# Altium PCB Grantv3.PcbDoc (part 3 of 3)
Units mm, origin at the board's own origin, x right, y up, seen from the top; angles counter-clockwise.
Board outline 132.82 x 71.6 mm, 2 copper layers (Top Layer, Bottom Layer), stack 1.448 mm thick; 97 components, 63 nets, 317 pads, 96 vias.
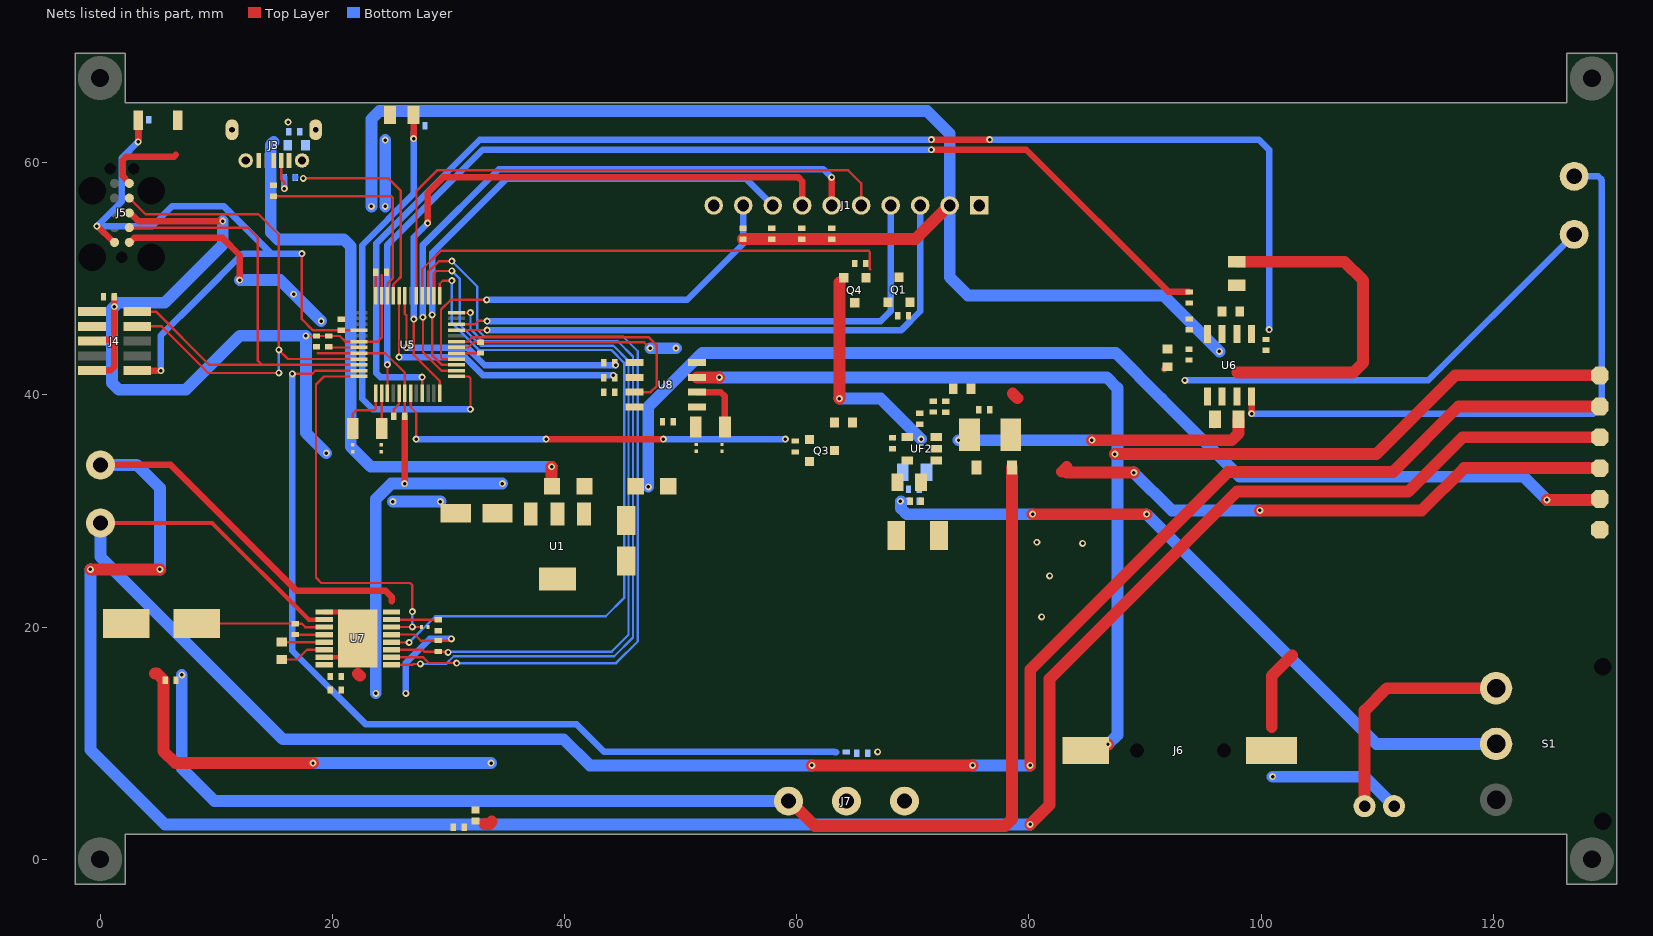
[diagram p2: the nets of this part, all layers, seen from the top]

## Via types
v1: diameter 0.6, hole 0.3, Top Layer to Bottom Layer, tented both sides, 96 vias

## Nets (pads, with @x,y where several pads share a name; then routed paths per layer and width w, separated by ;. In a path a pad name is that pad's centre, name@x,y a point inside that pad or via, vN(x,y) a via of type N, cw(c..) or ccw(c..) an arc to the next point about the centre after c; other vN are vias at no path point)
3V3: C2.1 C8.1 C11.1 C12.1 C13.1 C14.1 C24.1 C29.1 J1.2 J4.1 J5.1 R1.2 R3.2 R6.1 R8.1 R9.2 R12.1 R15.2 R16.2 R17.2 R18.1 R26.2 R33.1 R34.1 U1.3 U5.6 U5.17 U5.36 U5.44 U6.6 U7.5 U8.8 | length 200.2
  Top Layer w0.203: 18.763,43.591 22.293,43.591 22.298,43.586 24.568,43.586 26.251,41.904 U5.6@26.251,40.134 26.245,40.127 26.245,38.157 C13.1@26.238,38.151 ; C11.1@23.736,50.521 23.751,50.506 U5.36@23.751,48.534 ; U7.5@24.612,19.355 27.102,19.355 27.635,18.821 29.121,18.821 R12.1@29.134,18.834 30,18.834 30.144,18.979 v1(30.251,18.979) ; U5.17@30.701,43.584 30.703,43.585 32.752,43.585 C12.1@32.766,43.599
  Top Layer w0.559: J5.1@2.515,53.137 2.576,53.137 2.951,53.511 10.547,53.511 12.027,52.032 v1(12.027,49.886) ; v1(26.238,32.36) C13.1@26.238,38.151 ; C8.1@95.987,37.371 C8.1@96.215,37.6
  Top Layer w1.016: R34.1@55.372,53.416 R33.1@57.861,53.416 R8.1@60.427,53.416 R6.1@63.017,53.416 70.23,53.416 J1.2@73.153,56.339
  Bottom Layer w0.559: v1(26.34,14.289) 26.34,16.916 28.402,18.979 v1(30.251,18.979)
  Bottom Layer w1.016: v1(12.027,49.886) 15.519,49.886 v1(19.05,46.355) ; v1(23.368,56.236) 23.368,63.743 24.065,64.44 71.247,64.44 73.179,62.508 J1.2@73.179,56.314 73.179,50.138 74.752,48.565 91.567,48.565 96.393,43.739 v1(96.418,43.739) ; v1(23.749,14.289) 23.749,31.025 25.083,32.36 v1(26.238,32.36) v1(34.646,32.36)
  other v1: 16.662,48.666
3V3ZD: C7.1 C21.1 CE1.1 CF2.1 CR1.1 D3.A LZ1.1 RZ1.2 S1.2 UF2.5 | length 60.3
  Top Layer w1.016: v1(80.315,29.718) v1(90.145,29.718)
  Bottom Layer w1.016: v1@68.986,30.836 68.986,30.211 69.479,29.718 v1(80.315,29.718) ; v1(90.145,29.718) 109.931,9.931 S1.2@120.241,9.931
  other v1: 68.936,30.836
12V: C22.1 C23.2 C25.1 C26.1 C27.1 D2.K J7.1 P16.1 Q1.2 R24.1 SB3.2 U7.11 | length 173.1
  Top Layer w0.203: C26.1@8.941,20.32 C25.1@16.811,20.29 17.376,20.29 ; 17.431,20.238 17.673,19.996 U7.11@19.3,19.996
  Top Layer w1.016: J7.1@59.18,5.251 61.561,2.87 77.947,2.87 78.542,3.465 D2.K@78.542,33.731 ; J7.1@59.291,5.004 J7.1@59.693,5.004 ; 78.613,40.107 79.019,39.7 ; 82.855,33.376 83.261,33.782 ; 83.261,33.299 v1(89.052,33.299) ; v1(99.898,30.048) 113.843,30.048 117.485,33.691 P16.1@129.184,33.691
  Bottom Layer w1.016: v1(7.036,15.875) 7.036,7.823 9.855,5.004 J7.1@59.291,5.004 ; v1(89.052,33.299) 92.304,30.048 v1(99.898,30.048)
#X1_: C16.2 U5.1 X1.2 | length 4.7
  Top Layer w0.203: X1.2@21.763,37.11 21.768,37.115 21.768,38.358 22.096,38.686 23.632,38.686 23.751,38.805 U5.1@23.751,40.134
#X2_: C17.2 U5.2 X1.1 | length 3
  Top Layer w0.203: U5.2@24.251,40.134 24.251,37.121 X1.1@24.263,37.11
AMP.SHDN: R3.1 U5.9 U6.1 | length 113.3
  Top Layer w0.203: v1(27.737,41.529) 27.744,41.522 27.744,40.141 U5.9@27.751,40.134 ; R3.1@100.432,44.775 R3.1@100.563,44.643
  Top Layer w0.559: v1(71.603,61.976) 76.613,61.976 v1(76.622,61.986)
  Bottom Layer w0.559: v1(27.737,41.529) 24.13,41.529 23.8,41.859 23.8,53.067 32.709,61.976 v1(71.603,61.976) ; v1(76.622,61.986) 99.812,61.986 100.686,61.112 v1(100.686,45.618)
AMP.VOUT: C50.2 U5.3 | length 90.3
  Top Layer w0.203: v1(24.74,42.596) 24.751,42.584 U5.3@24.751,40.134
  Top Layer w0.559: v1(71.603,61.112) 79.781,61.112 92.024,48.87 C50.2@93.764,48.87
  Bottom Layer w0.559: v1(24.74,42.596) 24.74,52.908 32.944,61.112 v1(71.603,61.112)
B_IN1: U5.24 U7.1 | length 63.6
  Top Layer w0.203: U7.1@25.1,16.746 26.924,16.746 26.997,16.818 v1(27.581,16.818) ; U5.24@30.701,47.084 v1(31.902,47.084)
  Bottom Layer w0.203: v1(27.581,16.818) 29.804,16.818 30.469,17.483 44.28,17.483 45.898,19.101 45.898,43.307 44.583,44.622 32.943,44.622 31.902,45.662 v1(31.902,47.084)
B_IN2: U5.27 U7.2 | length 73.1
  Top Layer w0.203: U7.2@25.1,17.396 25.102,17.398 27.821,17.398 28.315,16.903 v1@30.691,16.903 ; U5.27@28.251,48.534 28.251,50.578 29.185,51.511 v1(30.302,51.511)
  Bottom Layer w0.203: v1(30.302,51.511) 32.482,49.332 32.482,45.622 33.101,45.003 45.066,45.003 46.314,43.755 46.314,18.755 44.45,16.891 v1(30.709,16.891)
BST_EN: Q3.1 R11.1 U5.7 | length 35.9
  Top Layer w0.203: U5.7@26.751,40.134 26.751,38.933 27.229,38.456 v1(27.229,36.195)
  Top Layer w0.559: v1@38.411,36.189 38.417,36.189 v1(48.515,36.195)
  Bottom Layer w0.559: v1(27.229,36.195) 38.405,36.195 v1(38.417,36.182) ; v1(48.515,36.195) v1(59.03,36.195)
BUTTON1: J1.6 R6.2 U5.14 | length 53.4
  Top Layer w0.203: v1(27.813,46.685) 27.813,43.674 29.404,42.084 U5.14@30.701,42.084
  Top Layer w0.559: v1(63.017,58.725) v1(63.017,58.725) J1.6@63.019,56.314
  Bottom Layer w0.559: v1(27.813,46.685) 27.813,52.908 34.341,59.436 62.306,59.436 v1(63.017,58.725)
BUTTON2: J1.7 R8.2 U5.12 | length 53.7
  Top Layer w0.203: v1(27.026,46.533) 27.026,43.414 29.251,41.188 U5.12@29.251,40.134
  Top Layer w0.559: v1(28.219,54.788) 28.219,57.379 29.566,58.725 60.151,58.725 60.479,58.397 J1.7@60.479,56.314
  Bottom Layer w0.559: v1(27.026,46.533) 27.026,53.594 ; 27.056,53.624 v1(28.219,54.788)
BUTTON3: J1.8 R33.2 U5.15 | length 44.2
  Top Layer w0.203: v1(28.6,46.888) 28.6,43.426 29.443,42.584 U5.15@30.701,42.584
  Bottom Layer w0.559: v1(28.6,46.888) 28.6,52.222 35.001,58.623 55.629,58.623 J1.8@57.939,56.314
BUTTON4: J1.9 R34.2 U5.16 | length 37.2
  Top Layer w0.203: U5.16@30.701,43.084 29.481,43.084 29.362,43.203 29.362,47.346 30.201,48.184 v1(33.299,48.184)
  Bottom Layer w0.559: v1(33.299,48.184) 50.571,48.184 55.399,53.011 J1.9@55.399,56.314
COIN_VBAT: J6.1 P13.1 U8.3 | length 114.4
  Top Layer w1.016: U8.3@51.414,41.504 v1(53.34,41.504) ; J6.1@84.906,9.373 85.42,9.887 v1(86.817,9.887) ; v1(87.401,34.9) 109.931,34.9 116.713,41.681 129.164,41.681 P13.1@129.184,41.661
  Bottom Layer w1.016: v1(53.34,41.504) 86.716,41.504 87.63,40.589 87.63,10.7 v1(86.817,9.887)
EN_ZD: RZ1.1 SB_ZD1.1 UF2.4
FB#: CF1.1 RF5.2 RF6.2 UF2.3
GND: C1.2 C2.2 C7.2 C8.2 C11.2 C12.2 C13.2 C14.2 C15.2 C16.1 C17.1 C18.2 C19.2 C21.2 C22.2 C23.1 C24.2 C26.2 C27.2 C29.2 C30.2 C31.2 CE1.2 CF2.2 CR1.2 CX1.1 CX2.1 J1.10 J3.5 J3.MH1 J3.MH2 J3.MH3 J3.MH4 J4.3 J4.5 J4.9 J5.3 J5.5 J6.2 J7.3 LED1.2 P1.2 P12.1 P17.2 Q3.2 Q4.2 R2.1 R11.2 R14.2 R19.1 R20.1 R25.1 RF6.1 SW1.2 U1.2 U1.4 U5.5 U5.18 U5.35 U5.42 U6.7 U7.9 U7.15 U7.17 U8.4 UF2.2 | length 251.4
  Top Layer w0.203: v1(17.729,45.085) 17.742,45.072 C14.2@18.644,45.072 C15.2@19.685,45.072 20.637,45.072 21.126,44.584 U5.42@22.301,44.584 22.308,44.577 23.901,44.577 24.251,44.927 U5.35@24.251,48.534 24.251,50.286 24.282,50.317 ; U7.17@20.602,17.396 22.2,18.994 U7.17@22.2,19.021 ; C11.2@24.575,50.305 24.701,50.432 C11.2@24.701,50.521 ; C13.2@25.298,38.151 25.298,38.752 25.751,39.205 U5.5@25.751,40.134 ; U5.18@30.701,44.084 31.714,44.084 32.169,44.539 C12.2@32.766,44.539 46.859,44.539 v1(47.381,44.017)
  Top Layer w0.406: U7.15@19.3,17.396 U7.17@20.602,17.396
  Top Layer w0.457: U7.9@19.3,21.296 U7.17@20.729,21.296
  Top Layer w0.559: J4.9@-0.598,42.088 -0.57,42.116 0.92,42.116 1.219,42.415 1.219,44.475 0.949,44.745 J4.5@0.34,44.745 ; 1.232,45.263 v1(1.232,47.6) C29.2@1.232,48.463 ; J5.3@2.515,55.677 2.576,55.677 3.288,54.966 v1(10.566,54.966) ; J5.5@2.515,58.217 2.515,58.279 1.942,58.851 1.942,60.198 2.269,60.525 6.373,60.525 6.528,60.681
  Top Layer w1.016: 4.732,16.002 4.902,16.002 5.461,15.443 5.461,9.322 6.502,8.28 v1(18.339,8.28) ; 22.2,15.977 22.377,15.799 ; 33.096,3.043 33.533,3.043 33.731,3.241 ; v1(63.678,39.675) Q4.2@63.678,49.69 ; v1(85.42,36.093) 97.474,36.093 98.069,36.689 C8.2@98.069,37.897 ; C19.2@97.917,51.468 107.18,51.468 108.788,49.86 108.788,42.774 107.932,41.918 97.942,41.918 ; 100.927,11.379 100.927,15.801 102.692,17.566
  Bottom Layer w1.016: v1(10.566,54.966) 10.566,52.934 5.563,47.93 1.562,47.93 v1(1.232,47.6) 1.016,47.384 1.016,41.032 1.611,40.437 7.391,40.437 12.04,45.085 v1(17.729,45.085) 17.729,36.728 v1(19.482,34.976) ; v1(18.339,8.28) v1(33.68,8.28) ; v1(24.562,56.236) v1(24.562,61.951) ; v1(25.222,30.81) v1(29.312,30.81) ; v1(47.381,44.017) 49.605,44.017 v1(49.606,44.018) ; v1(63.678,39.675) 67.234,39.675 v1(70.714,36.195) ; v1(73.939,36.093) v1(85.42,36.093) ; v1(100.99,7.112) 108.915,7.112 P17.2@111.455,4.572
  other v1: 66.98,9.246 81.102,20.879 81.788,24.409 84.633,27.203 80.696,27.305
IMODE: R20.2 U7.7 | length 4
  Top Layer w0.203: U7.7@25.1,20.646 25.106,20.639 29.128,20.639 R20.2@29.134,20.633
IN_M: C9.1 R4.2 R10.1 U6.4
IN_P: SB21.1 U6.3
IN_P#: C19.1 SB21.2 U6.2
MCU_D+: RF23.1 U5.34 | length 19.1
  Top Layer w0.203: RF23.1@14.834,57.099 25.095,57.099 25.216,56.978 25.216,50.069 24.751,49.604 U5.34@24.751,48.534
MCU_D-: RF22.1 U5.33 | length 18.1
  Top Layer w0.203: v1(17.501,58.649) 24.841,58.649 25.883,57.607 25.883,50.14 25.796,50.053 ; U5.33@25.251,48.534 25.251,49.509 25.781,50.039
MFP: R17.1 U5.19 U8.7 | length 23.4
  Top Layer w0.203: U5.19@30.701,44.584 31.675,44.584 32.062,44.971 47.246,44.971 47.96,44.257 47.96,40.772 47.422,40.234 U8.7@46.014,40.234
NetC20_1: C20.1 U7.13 | length 3.7
  Top Layer w0.203: C20.1@15.639,18.718 15.662,18.696 U7.13@19.3,18.696
NetC20_2: C20.2 U7.14 | length 4
  Top Layer w0.203: C20.2@15.651,17.206 16.979,17.206 17.819,18.046 U7.14@19.3,18.046
NetC25_2: C25.2 U7.12 | length 2.5
  Top Layer w0.203: C25.2@16.811,19.35 16.813,19.348 19.298,19.348 U7.12@19.3,19.346
NetCF1_2: CF1.2 RF5.1 SB3.1
NetJ3_2: J3.2 RF22.2 | length 3.5
  Top Layer w0.203: J3.2@15.618,60.237 15.618,58.55 15.875,58.293 v1(15.875,57.76)
  Bottom Layer w0.559: v1(15.875,57.76) RF22.2@15.875,58.725
NetJ3_3: J3.3 RF23.2 | length 0
  Top Layer w0.203: RF23.2@14.85,58.06 RF23.2@14.859,58.052
NetLED1_1: LED1.1 R1.1
NetQ1_1: Q1.1 Q4.3 R24.2
NetQ3_3: Q3.3 SB_ZD1.2
nFAULT: U5.25 U7.4 | length 64
  Top Layer w0.203: U7.4@25.1,18.696 25.113,18.682 v1(26.619,18.669) ; U5.25@29.251,48.534 29.251,49.577 29.509,49.835 v1(30.302,49.835)
  Bottom Layer w0.203: v1(26.619,18.669) 28.88,20.93 43.561,20.93 45.136,22.504 45.136,42.768 44.044,43.86 32.627,43.86 30.302,46.185 v1(30.302,49.835)
NRST_: C18.1 J4.10 J5.10 R9.1 SW1.1 U5.40 | length 63
  Top Layer w0.203: v1(17.374,52.172) 17.374,46.584 17.374,46.523 18.341,45.555 20.764,45.555 R9.1@20.777,45.568 20.785,45.576 22.293,45.576 U5.40@22.301,45.584
  Top Layer w0.559: v1(-0.27,54.534) -0.214,54.534 1.183,53.137 J5.10@1.245,53.137 ; v1(3.277,61.798) 3.278,61.8 SW1.1@3.278,63.652 ; J4.10@3.302,42.088 v1(5.232,42.088)
  Bottom Layer w0.559: C18.1@3.27,63.697 3.27,61.792 1.88,60.401 1.88,56.683 v1(-0.27,54.534) 4.496,54.534 6.223,56.261 10.636,56.261 14.681,52.216 14.681,52.172 ; v1(5.232,42.088) 5.232,45.11 8.425,48.303 12.294,52.172 14.681,52.172 ; v1(17.374,52.172) 14.681,52.172
nSLEEP: R12.2 U5.26 U7.3 | length 69.1
  Top Layer w0.203: U7.3@25.1,18.046 27.751,18.046 27.915,17.882 29.121,17.882 29.145,17.857 29.95,17.857 v1(29.987,17.82) ; U5.26@28.751,48.534 28.751,50.494 28.931,50.673 v1(30.302,50.673)
  Bottom Layer w0.203: v1(29.987,17.82) 30.048,17.882 44.069,17.882 45.517,19.329 45.517,42.926 44.202,44.241 32.785,44.241 30.988,46.038 30.988,49.987 v1(30.302,50.673)
OLED_IO: Q4.1 R25.2 U5.28 | length 43.1
  Top Layer w0.203: U5.28@27.751,48.534 27.751,50.814 29.362,52.426 66.179,52.426 66.298,52.307 66.298,50.843 66.336,50.805
OLED_RST: J1.5 U5.29 | length 50.4
  Top Layer w0.203: U5.29@27.251,48.534 27.251,57.553 29.032,59.334 64.44,59.334 65.559,58.216 J1.5@65.559,56.314
OLED_SCL: J1.4 U5.22 | length 47
  Top Layer w0.203: U5.22@30.701,46.084 32.305,46.084 32.602,46.38 33.32,46.38 v1(33.341,46.36)
  Bottom Layer w0.559: v1(33.341,46.36) 67.239,46.36 68.099,47.22 J1.4@68.099,56.314
OLED_SDA: J1.3 U5.21 | length 49.7
  Top Layer w0.203: U5.21@30.701,45.584 v1(33.341,45.582)
  Bottom Layer w0.559: v1@33.342,45.584 69.028,45.584 70.639,47.194 J1.3@70.639,56.314
OUT_1: J8.1 P14.1 U7.8 | length 217.8
  Top Layer w0.559: J8.1@-0.31,33.96 J8.1@0.025,33.96 6.096,33.96 16.942,23.114 24.613,23.114 25.133,22.593 25.133,22.225
  Top Layer w1.016: v1(-0.838,24.968) v1(5.156,24.968) ; v1(80.112,2.997) 81.788,4.674 81.788,15.545 97.917,31.674 112.687,31.674 117.361,36.347 P14.1@129.184,36.347
  Bottom Layer w1.016: v1(-0.838,24.968) -0.838,9.423 5.588,2.997 v1(80.112,2.997) ; J8.1@0.025,33.96 J8.1@0.076,33.96 ; J8.1@0.127,33.909 J8.1@0.076,33.96 ; 3.124,33.96 J8.1@0.076,33.96 ; 3.226,33.909 5.156,31.979 v1(5.156,24.968)
OUT_2: J8.2 P15.1 U7.10 | length 180.1
  Top Layer w0.381: J8.2@-0.225,28.96 9.648,28.96 17.962,20.646 U7.10@19.3,20.646
  Top Layer w1.016: v1(61.316,8.077) v1(75.159,8.077) ; v1(80.112,8.077) 80.112,16.332 97.13,33.35 111.354,33.35 117.008,39.004 P15.1@129.184,39.004
  Bottom Layer w1.016: J8.2@0.025,28.96 0.025,26.06 15.748,10.338 39.916,10.338 42.177,8.077 v1(61.316,8.077) ; v1(75.159,8.077) v1@80.086,8.077
PMODE: R18.2 R19.2 U7.16
RD_SW: P1.1 R26.1 U5.13 | length 41
  Top Layer w0.203: U5.13@30.701,41.584 31.745,41.584 31.902,41.426 v1(31.902,38.76)
  Top Layer w0.559: v1@27,62.059 27,64.102 P1.1@27.004,64.105
  Bottom Layer w0.559: v1(27,62.078) 27,62.63 27.004,62.633 27.004,62.078 27.004,57.312 22.581,52.889 22.581,39.675 23.495,38.76 v1(31.902,38.76)
SCL_: R16.1 U5.32 U8.6 | length 24.5
  Top Layer w0.203: v1@25.679,43.18 v1(25.751,43.252) U5.32@25.751,48.534
  Bottom Layer w0.559: v1(25.751,43.252) 31.403,43.252 32.974,41.681 v1(44.221,41.681)
SDA_: R15.1 U5.31 U8.5 | length 23.2
  Top Layer w0.203: U5.31@26.251,48.534 26.251,47.934 26.238,47.947 26.238,46.99 26.391,46.838 v1(26.391,44.069) v1@26.372,44.088
  Bottom Layer w0.559: v1(26.391,44.069) 31.628,44.069 33.137,42.56 v1(44.414,42.56)
SENS_IN: J7.2 R13.2
SPK_N: C9.2 J#1.1 R4.1 U6.5 | length 39.1
  Top Layer w0.559: C9.2@91.678,42.219 91.885,42.426 C9.2@91.948,42.426
  Bottom Layer w0.559: v1(93.447,41.25) 114.398,41.25 125.269,52.121 J#1.1@126.975,53.826
SPK_P: J#1.2 U6.8 | length 53.8
  Top Layer w0.559: v1(99.187,38.379) U6.8@99.187,39.853
  Bottom Layer w0.559: v1(99.187,38.379) 128.6,38.379 129.362,39.141 129.362,58.499 129.035,58.826 J#1.2@126.975,58.826
SW_ZD: D2.A LZ1.2 UF2.1
SWDCLK: J4.4 J5.4 U5.45 | length 47.2
  Top Layer w0.203: J5.4@2.515,56.947 3.912,55.55 13.64,55.55 15.392,53.797 v1(15.392,43.866) 16.175,43.084 U5.45@22.301,43.084 ; J4.4@3.2,45.898 5.309,45.898 9.322,41.885 v1(15.392,41.885)
  Bottom Layer w0.203: v1(15.392,41.885) v1(15.392,43.866)
SWDIO: J4.2 J5.2 U5.46 | length 43.5
  Top Layer w0.203: J5.2@2.515,54.407 2.535,54.386 12.746,54.386 13.594,53.538 13.594,42.94 13.95,42.584 ; J4.2@3.2,47.168 4.826,47.168 9.41,42.584 13.95,42.584 ; U5.46@22.301,42.584 13.95,42.584
VBAT_M: P17.1 S1.1 | length 20.4
  Top Layer w1.016: P17.1@108.915,4.572 108.915,12.802 110.845,14.731 S1.1@120.241,14.731
VDD: J1.1 Q1.3
VDD_C: C15.1 U5.43 | length 2.6
  Top Layer w0.203: C15.1@19.685,44.133 19.734,44.084 U5.43@22.301,44.084
VDR_Out: R13.1 R14.1 U5.47 | length 80.2
  Top Layer w0.203: v1(16.561,41.808) 18.263,41.808 18.538,42.084 U5.47@22.301,42.084
  Bottom Layer w0.559: v1(16.561,41.808) 16.561,17.951 22.9,11.612 41.068,11.612 43.434,9.246 63.246,9.246 63.297,9.195 63.398,9.195
VIN: C1.1 D1.K D3.K P2.1 U1.1 | length 96.1
  Top Layer w1.016: v1(124.612,30.947) 129.098,30.947 P2.1@129.184,31.034
  Bottom Layer w1.016: v1(47.219,32.08) 47.219,38.964 51.867,43.612 87.478,43.612 91.415,39.675 98.146,32.944 122.616,32.944 v1(124.612,30.947)
VOUT#: C50.1 R10.2
VPROP: R2.2 U5.48 U7.6 | length 35.4
  Top Layer w0.203: U5.48@22.301,41.584 19.282,41.584 18.593,40.894 18.593,24.257 19.05,23.8 26.695,23.8 26.899,23.597 v1(26.899,21.336) ; U7.6@25.1,19.996 25.107,20.003 27.683,20.003 R2.2@27.691,20.011
  Bottom Layer w0.203: v1@26.848,21.336 26.899,21.285 v1(26.899,20.015)
VUSB: C30.1 C31.1 D1.A J3.1 | length 52.3
  Top Layer w0.559: v1@16.193,63.501 v1(16.205,63.501)
  Top Layer w1.016: v1(38.887,33.807) 38.887,32.184 D1.A@38.935,32.136
  Bottom Layer w1.016: 14.961,61.785 14.707,61.531 14.707,53.986 15.302,53.391 20.995,53.391 21.59,52.796 21.59,35.535 23.317,33.807 v1(38.887,33.807)
X1: CX1.2 U8.1 X2.2
X2: CX2.2 U8.2 X2.1 | length 5.2
  Top Layer w0.559: U8.2@51.414,40.234 53.467,40.234 53.823,39.878 X2.1@53.823,37.232
pads on no net: J3.4 J4.6 J4.7 J4.8 J5.6 J5.7 J5.8 J5.9 J5.MP1 J5.MP2 J5.MP3 J5.MP4 J5.MP5 J5.MP6 J5.MP7 J6.MH1 J6.MH2 S1.3 S1.MH1 S1.MH2 U5.4 U5.8 U5.10 U5.11 U5.20 U5.23 U5.30 U5.37 U5.38 U5.39 U5.41

## Polygon pours and split planes (outlines as drawn)
GND on Top Layer "Polygon_1" (hatched 45Degree grid 0.508 track 0.254, remove dead copper, pour order 2): 0.432,62.738 128.168,62.738 128.168,4.75 128.168,4.724 128.016,4.724 0.432,4.724
GND on Top Layer "Polygon_1" (hatched 45Degree grid 0.508 track 0.254, remove dead copper, pour order 0): 23.749,62.586 23.851,62.586 93.243,62.586 93.243,4.623 93.193,4.572 93.091,4.674 21.539,4.674 21.539,62.56
GND on Bottom Layer "Polygon_2" (hatched 45Degree grid 0.508 track 0.254, remove dead copper, pour order 4): 0.432,62.738 128.168,62.738 128.168,4.75 128.168,4.724 128.016,4.724 0.432,4.724
GND on Bottom Layer "Polygon_2" (hatched 45Degree grid 0.508 track 0.254, remove dead copper, pour order 1): 23.749,62.586 23.851,62.586 93.243,62.586 93.243,4.623 93.193,4.572 93.091,4.674 21.539,4.674 21.539,62.56
no net on Mechanical 2 "NONET_L-01_P-001" (solid): 128.118,62.713

## Other copper
Top Layer:
  rectangle net VUSB: 15.773,63.144 16.51,63.881
  rectangle net 3V3: 95.352,36.906 97.028,38.786
  rectangle net IN_P: 96.012,44.407 97.053,48.242
  rectangle net 3V3: 95.987,37.371 97.028,44.153
  rectangle net SPK_N: 91.237,39.047 95.682,43.264
  rectangle net AMP.VOUT: 93.37,48.565 94.209,49.149
  rectangle net VOUT#: 91.262,46.261 95.707,48.242
  rectangle net IN_M: 91.237,43.518 95.707,46.058
  rectangle net AMP.SHDN: 98.857,44.407 101.092,46.083
  rectangle net 3V3: 96.876,43.416 101.092,44.153
  rectangle net IN_P#: 97.282,44.407 98.577,49.919
  rectangle net GND: 97.257,36.906 98.603,42.426
  rectangle net 3V3: 16.332,43.917 17.018,49.073
  rectangle net 3V3: 16.332,43.485 19.05,44.475
  rectangle net 3V3: 18.694,50.14 23.952,56.718
  rectangle net 3V3: 18.694,45.999 19.761,50.952
  rectangle net GND: 48.997,42.266 64.186,51.998
  rectangle net GND: 48.997,35.281 50.19,43.231
  rectangle net GND: 23.216,15.291 33.68,16.256
  rectangle net GND: 33.249,2.337 34.282,19.787
  region net GND: 34.239,3.749 31.953,3.749 31.953,2.337 34.239,2.337
  region net GND: 5.969,23.978 -1.092,23.978 -1.092,14.935 5.969,14.935
  rectangle net 12V: 6.299,14.935 14.427,23.47
  rectangle net GND: 28.042,19.456 34.282,20.218
  region net 3V3: 30.683,15.108 20.265,15.108 20.265,2.337 30.683,2.337
  rectangle net GND: 20.498,15.291 23.901,16.662
  region net PMODE: 20.087,16.988 18.436,16.988 18.436,14.219 20.087,14.219
  rectangle net OUT_1: 24.333,21.057 25.933,23.393
  rectangle net GND: 28.753,23.038 47.803,27.026
  rectangle net VDD: 67.818,49.484 75.413,51.994
  rectangle net 3V3: 0.152,49.352 12.573,50.394
  rectangle net GND: -1.956,44.221 1.524,46.304
  rectangle net NetLED1_1: 31.217,3.937 32.791,4.699
  rectangle net COIN_VBAT: 50.521,40.996 51.537,42.012
  rectangle net GND: 12.776,64.059 17.424,64.922
  rectangle net 3V3: 25.959,38.176 26.518,38.633
  rectangle net GND: 63.65,49.611 65.222,51.998
  rectangle net 3V3ZD: 48.311,26.325 70.028,33.376
  rectangle net GND: 6.071,58.445 13.919,64.922
  rectangle net VUSB: 16.002,59.487 16.51,63.805
  rectangle net GND: 16.739,59.461 25.476,64.922
  rectangle net GND: 0.914,48.158 1.549,48.92
  rectangle net 3V3: -1.956,46.761 0.61,50.394
  rectangle net NetJ3_3: 14.707,57.836 15.189,60.858
  rectangle net GND: 24.15,50.19 24.937,56.718
  rectangle net 3V3: 18.694,45.999 21.107,46.736
  rectangle net GND: 98.654,2.286 103.2,29.159
  rectangle net 3V3: 54.534,52.908 55.804,53.924
  rectangle net BUTTON4: 54.534,54.127 56.236,57.429
  rectangle net BUTTON3: 57.074,54.127 58.776,57.429
  rectangle net BUTTON2: 59.614,54.127 61.316,57.429
  rectangle net BUTTON1: 62.154,54.127 63.856,57.429
  rectangle net VDD: 74.872,49.484 76.53,57.15
  rectangle net OLED_IO: 65.55,49.611 67.122,51.998
  rectangle net NetQ1_1: 64.491,46.063 69.017,48.45
  rectangle net 12V: 69.344,46.063 84.455,48.45
  rectangle net GND: 98.654,24.354 130.226,29.185
  rectangle net X2: 53.122,35.56 54.458,39.294
  rectangle net X1: 50.622,35.56 52.4,39.294
  rectangle net 3V3: 43.434,37.186 48.717,39.421
  rectangle net MFP: 43.942,39.726 46.914,40.691
  rectangle net SCL_: 43.866,40.996 46.914,42.012
  rectangle net SDA_: 43.866,42.189 46.914,43.917
  rectangle net GND: 48.997,33.812 61.595,35.382
  rectangle net BST_EN: 58.014,35.712 61.595,36.678
  rectangle net NetQ3_3: 62.814,34.773 63.729,38.964
  rectangle net EN_ZD: 64.313,36.017 70.053,38.964
  rectangle net FB#: 70.231,37.884 71.577,38.976
  rectangle net FB#: 71.399,35.992 73.177,38.976
  rectangle net NetCF1_2: 70.231,39.218 73.99,41.097
  rectangle net 12V: 74.371,39.726 76.479,46.33
  rectangle net 12V: 76.225,32.791 84.455,46.406
  rectangle net GND: 73.431,35.408 75.971,39.04
  rectangle net GND: 71.145,35.001 75.971,35.789
  rectangle net GND: 70.231,30.302 71.222,37.694
  rectangle net SW_ZD: 71.476,26.325 75.997,34.722
  rectangle net 3V3ZD: 67.742,32.004 70.028,35.789
  rectangle net GND: 38.125,23.114 40.513,30.836
  rectangle net GND: 28.753,24.663 31.995,32.017
  rectangle net 3V3: 36.271,37.186 43.637,43.917
  rectangle net 3V3: 32.385,28.499 37.846,43.917
  rectangle net VIN: 40.792,27.762 47.803,33.376
  region net NetLED1_1: 31.716,2.337 31.716,4.699 30.886,4.699 30.886,2.337
  rectangle net GND: 25.07,35.154 25.654,38.557
  rectangle net GND: 18.948,30.099 25.654,35.357
  rectangle net #X1_: 21.102,35.54 22.397,38.105
  rectangle net #X2_: 23.597,35.535 24.79,38.1
Bottom Layer:
  rectangle net VUSB: 13.36,59.639 16.561,63.932
  rectangle net MCU_D-: 16.535,58.293 17.907,59.055
  region net GND: 67.31,9.703 65.857,9.703 65.857,8.788 67.31,8.788
  rectangle net GND: 3.962,59.639 13.157,64.033
  rectangle net NRST_: 2.978,63.671 3.556,64.103
  rectangle net VDR_Out: 62.967,8.788 65.659,9.703
  rectangle net SENS_IN: 62.967,3.785 65.659,8.509
  rectangle net 3V3: 27.661,62.789 28.372,64.948
  rectangle net MCU_D-: 16.535,58.395 17.094,59.055
  region net GND: 18.923,63.932 16.789,63.932 16.789,59.639 18.923,59.639
  rectangle net RD_SW: 26.688,62.521 27.33,63.562
  region net GND: 71.841,34.21 70.282,34.21 70.282,30.455 71.841,30.455
  rectangle net 3V3ZD: 68.478,29.21 69.901,34.21
  rectangle net NetJ3_2: 15.596,58.395 16.154,59.055

## Silkscreen, mask and mechanical layers (free items; w line width, h text height)
Top Overlay:
  lines w0.254: 28.194,20.341 28.194,21.66 28.48,21.946 29.54,21.946 ; 69.723,39.421 69.85,39.548 71.272,39.522
  text "USB" at 19.177,63.627 h1.52
  text "REED" at 24.184,62.022 h1.52
  text "SW" at 23.93,60.268 h1.52
  text "SPK_P" at 117.627,58.115 h1.78
  text "SPK_N" at 117.551,53.162 h1.78
  text "#" at 25.273,50.851 h1.02 r180
  text "JTAG" at 6.02,50.673 h1.52
  text "SPEAKER" at 122.352,48.895 h1.78
  text "#" at 2.261,48.793 h1.02 r180
  text "SERIAL_WIRE" at 4.851,46.457 h1.52
  text "DEBUGGER" at 4.597,44.164 h1.52
  text "#" at 33.452,44.005 h1.02 r180
  text "#" at 18.313,43.586 h1.02 r180
  text "#" at 19.837,42.926 h1.02
  text "COIN_VBAT" at 117.678,40.767 h1.52
  text "#" at 74.651,39.027 h1.02 r180
  text "#" at 26.746,38.456 h1.02 r180
  text "#" at 47.422,38.011 h1.02 r180
  text "OUT_2" at 117.653,37.973 h1.52
  text "MOTOR" at -2.022,37.06 h1.78
  text "OUT_1" at 117.678,35.281 h1.52
  text "OUT_1" at 2.287,33.731 h1.78
  text "12V" at 117.678,32.842 h1.52
  text "#" at 69.258,31.19 h1.02 r180
  text "VIN" at 117.627,30.15 h1.52
  text "OUT_2" at 2.287,28.626 h1.78
  text "GND" at 117.627,27.407 h1.52
  text "#" at 16.535,21.501 h1.02 r180
  text "COIN_CELL" at 83.16,16.815 h1.78
  text "#" at 7.087,15.735 h1.02 r180
  text "ON" at 118.593,11.278 h1.78 r90
  text "BATTERY" at 106.02,9.703 h1.78
  text "+VE" at 106.02,7.976 h1.78
  text "-VE" at 110.211,7.976 h1.78
  text "12V" at 59.944,6.833 h1.78 r90
  text "IN" at 64.956,6.82 h1.78 r90
  text "GND" at 69.934,6.82 h1.78 r90
  text "OFF" at 118.389,5.258 h1.78 r90
  text "PWR_LED" at 32.029,5.232 h1.52
  text "PROXIMITY SENSOR" at 47.041,2.311 h1.78
Bottom Overlay:
  drawing of 3075 lines, arcs and shapes, not listed
  text "#" at 2.718,63.373 h1.02
  text "#" at 15.723,62.992 h1.02 r180
  text "#" at 68.567,31.139 h1.02 r180
  text "ZERO CARBON FOOTPRINT" at 58.263,31.034 h0.8
  text "VBAT_M" at 128.448,14.351 h1.78
  text "VBAT_IN" at 128.549,9.55 h1.78
  text "+VE" at 107.861,5.544 h1.78 r270
  text "-VE" at 110.401,5.544 h1.78 r270
  text "Note:" at 13.792,3.861 h1.78
  text "# >> 0.1uF 0402" at 13.792,2.388 h1.78
Mechanical 1:
  circle w0.254: c65.559,56.314 r0.887
  circle w0.254: c62.993,56.324 r0.906
  circle w0.254: c112.64,11.293 r2.035
  circle w0.254: c112.625,55.804 r2.035
  circle w0.254: c16.019,11.315 r2.035
  circle w0.254: c15.891,55.869 r2.035
  lines w0.254: 13.783,9.065 13.656,58.039 114.875,58.039 ; 13.794,9.053 46.837,9.042 ; 46.824,14.046 81.824,14.046 ; 46.826,9.053 46.826,14.024 ; 81.828,14.046 81.826,9.053 114.864,9.053 ; 114.875,9.042 114.875,58.042 ; 51.589,55.078 77.065,55.078 77.065,55.375 77.065,57.634 51.589,57.634 51.589,55.078
Mechanical 2:
  lines w0.254: -2.159,-2.159 2.159,-2.159 2.159,2.134 126.34,2.134 126.34,-2.159 130.658,-2.159 130.658,69.418 126.34,69.418 126.34,65.151 2.159,65.151 2.159,69.444 -2.159,69.444 -2.159,69.266 -2.159,64.44 -2.159,1.422 -2.159,-2.159

## Dimensions
0,0 to 0,67.285 on Mechanical 1
0,0 to 128.499,0 on Mechanical 1
2.159,2.134 to 126.34,2.134 on Mechanical 1
-2.159,69.266 to -2.159,-2.159 on Mechanical 1
-2.159,69.266 to 130.658,69.418 on Mechanical 1